# Altium PCB Senzor.PcbDoc
Units mm, origin at the board's own origin, x right, y up, seen from the top; angles counter-clockwise.
Board outline 43 x 72 mm, 2 copper layers (Top Layer, Bottom Layer); 16 components, 7 nets, 41 pads, 1 vias.
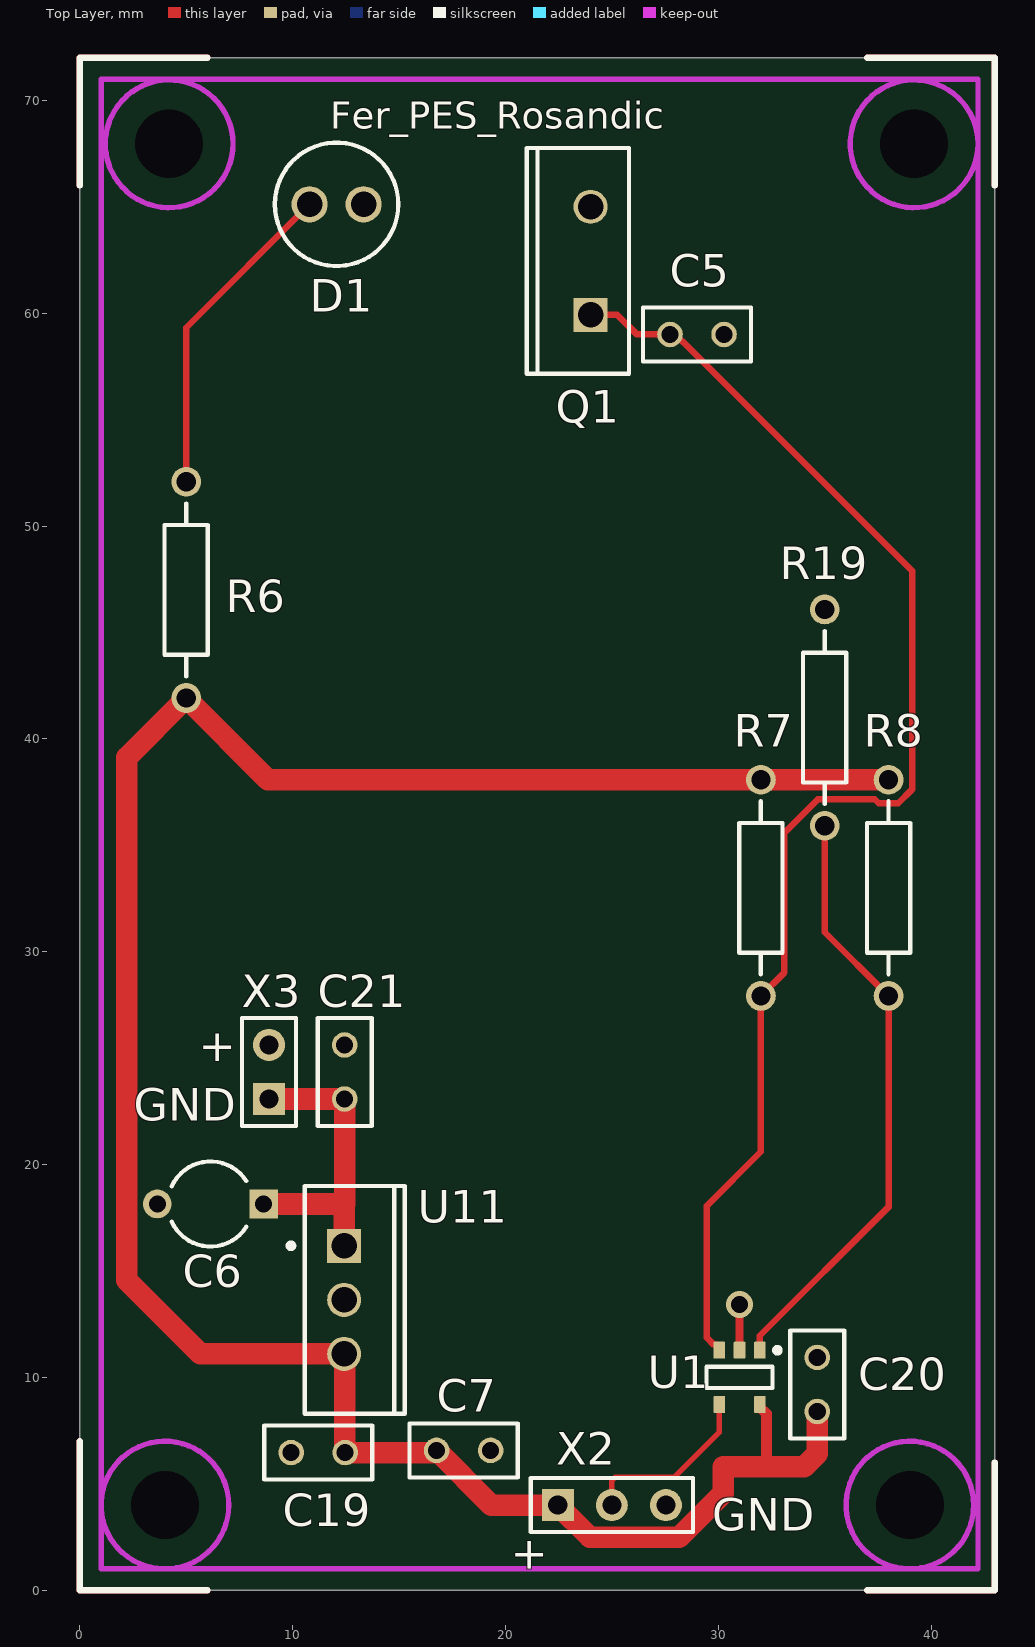
[diagram p0: Top Layer view]
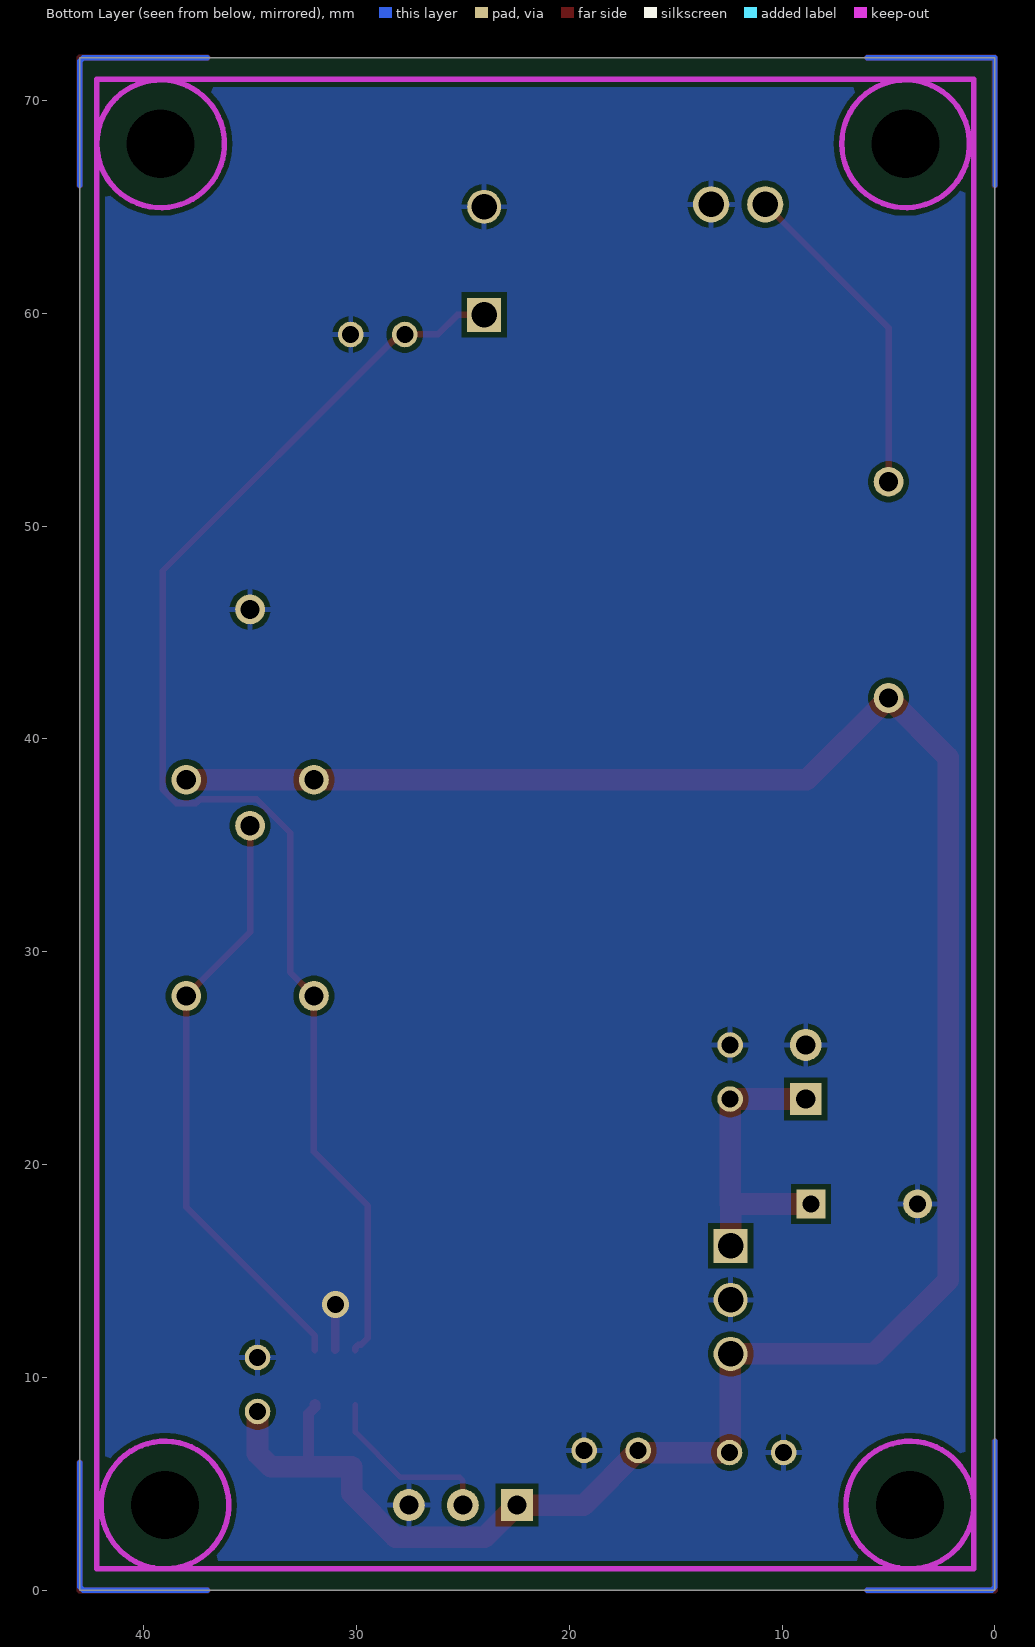
[diagram p1: Bottom Layer view, seen from below]

## Layer stack, top to bottom
Top Solder: solder mask 0.0102, Solder Resist, Dk 3.5
Top Layer: signal copper 0.0356
Dielectric 1: dielectric 0.32, FR-4, Dk 4.8
Bottom Layer: signal copper 0.0356
Bottom Solder: solder mask 0.0102, Solder Resist, Dk 3.5

## Board outline
0,0 43,0 43,72 0,72

## Design rules (kind name [scope] priority, off if disabled: settings)
Clearance [All] p1: gap=0.254 ignorepadtopadclearanceinfootprint=FALSE
HoleSize [All] p1: absolutevalues=TRUE maxlimit=3.2 minlimit=0.5 maxpercent=80.000 minpercent=20.000
PolygonConnect [All] p1: thpad.connectstyle=Relief thpad.reliefconductorwidth=0.254 thpad.reliefentries=4 thpad.polygonreliefangle="90 Angle" thpad.airgapwidth=0.254 smdpad.connectstyle=Relief smdpad.reliefconductorwidth=0.254 smdpad.reliefentries=4 smdpad.polygonreliefangle="90 Angle" smdpad.airgapwidth=0.254 via.connectstyle=Direct via.reliefconductorwidth=0.254 via.reliefentries=4 via.polygonreliefangle="90 Angle" via.airgapwidth=0.254
RoutingVias [All] p1: holewidth=0.5 width=0.7 viastyle="Through Hole" minholewidth=0.5 minwidth=0.7 maxholewidth=0.5 maxwidth=0.7
SilkToSolderMaskClearance SilkToSolderMaskClearance_1 [IsPad] p1: minsilkscreentomaskgap=0.203 clearancetoexposedcopper=TRUE
SilkToSolderMaskClearance [All] p2: minsilkscreentomaskgap=0.254 clearancetoexposedcopper=TRUE
SolderMaskExpansion [All] p1: expansion=0.102 istentingtop=FALSE
SupplyNets "Schematic Supply Nets_2" [InNet('GND')] p1: voltage=0.000
SupplyNets "Schematic Supply Nets_1" [InNet('+12V')] p2: voltage=0.000
SupplyNets "Schematic Supply Nets" [InNet('+5V')] p3: voltage=0.000
Width [All] p1: maxlimit=1.524 minlimit=0.254 preferedwidth=0.305
28 further rules are at their usual default settings.

## Classes and differential pairs
component class DZ1_2_Rosandic_Lovro: C5 C6 C7 C19 C21 D1 Q1 R7 R8 R19 U1 U11 X2 X3

## Components (designator, comment, footprint, x,y, rotation, side; value= is the part's Value field where it differs from the comment)
C5 "1000pF" RAD-0.1 29,59 r180 top
C6 "220u/50V" CAPR5-4x5 6.14,18.147 r180 top
C7 "0.01u" RAD-0.1 18.034,6.568 r180 top
C19 "100n" RAD-0.1 11.201,6.466 r0 top
C20 "100n" RAD-0.1 34.649,9.667 r270 top
C21 "100n" RAD-0.1 12.446,24.348 r270 top
D1 "IR LED" vish-tsal6200 12.065,65.115 r180 top
Q1 "L14G1" TO-220_A 24,62.46 r90 top
R6 "220" AXIAL-0.4 5,47 r90 top
R7 "680k" AXIAL-0.4 32,33 r90 top
R8 "56k" AXIAL-0.4 38,33 r90 top
R19 "56k" AXIAL-0.4 35,41 r270 top
U1 "LM321" DBV0005A_L 31,10 r270 top
U11 "LM341" NDE0003A 12.421,13.641 r270 top
X2 "" HDR1X3 22.46,4 r0 top
X3 "Napajanje 12V" HDR1X2 8.89,23.078 r90 top

## Footprints (in the part's own frame and the unit in brackets; to place one, negate y for a bottom-side part, rotate by r counter-clockwise, add the part's x,y. Pads: shape width x height; smd on the part's side, far side on the other; paste and mask are expansions set on the pad)
AXIAL-0.4 [mm] "Axial Device, Thru-Hole; 2 Leads; 0.4 in Pin Spacing"
  round 1.4 hole 0.9: 1(-5.08,0) 2(5.08,0)
  silkscreen extent -4.06,-1.02 4.06,1.02
CAPR5-4x5 [mm] "Capacitor; 2 Leads"
  rect 1.35x1.35 hole 0.8: 1(-2.5,0)
  round 1.35 hole 0.8: 2(2.5,0)
  silkscreen extent -1.69,-2 1.82,2
DBV0005A_L [mm] "SOT23, 5-Leads, Body 3.05x1.75mm, Pitch 0.95mm, IPC High Density"
  rrect18% 0.8x0.55 smd: 1(-1.275,0.95) 2(-1.275,0) 3(-1.275,-0.95) 4(1.275,-0.95) 5(1.275,0.95)
  silkscreen extent -1.4,-1.55 0.5,1.9, body extent -1.42,-1.46 1.42,1.46, height 1.08
HDR1X2 [mm] "Connector; Header; 2 Position"
  rect 1.5x1.5 hole 0.9: 1(0,0)
  round 1.5 hole 0.9: 2(2.54,0)
  silkscreen extent -1.27,-1.27 3.81,1.27
HDR1X3 [mm] "Connector; Header; 3 Position"
  rect 1.5x1.5 hole 0.9: 1(0,0)
  round 1.5 hole 0.9: 2(2.54,0) 3(5.08,0)
  silkscreen extent -1.27,-1.27 6.35,1.27
NDE0003A [mm] "FM, 3-Leads, Body 10.7x4.7mm, Pitch 2.54mm"
  rect 1.6x1.6 hole 1.2: 1(-2.54,0)
  round 1.6 hole 1.2: 2(0,0) 3(2.54,0)
  silkscreen extent -5.35,-2.62 5.35,2.85, body extent -5.4,-1.9 5.4,2.9, height 19.4
RAD-0.1 [mm] "Radial Cap, Thru-Hole; 2 Leads; 0.1 in Pin Spacing"
  round 1.2 hole 0.8: 1(-1.27,0) 2(1.27,0)
  silkscreen extent -2.54,-1.27 2.54,1.27
TO-220_A [mm] "TO, Thru-Hole, Vertical, Heatsink Mounted; 3 In-Line Leads (1 Absent); Pitch 2.54 mm"
  rect 1.6x1.6 hole 1.2: 1(-2.54,0)
  round 1.6 hole 1.2: 3(2.54,0)
  silkscreen extent -5.3,-1.8 5.3,3
vish-tsal6200 [mm] "THD, 2-Leads, Dia 5.8mm, Pitch 2.54mm"
  round 1.7 hole 1.2: 1(-1.27,0) 2(1.27,0)
  silkscreen extent -2.9,-2.9 2.9,2.9

## Part data
C5 C7 C19 C20 C21: library part Cap, "Capacitor", Dobavljac=DigiKey, PackageReference=RAD-0.3, Proizvođač="Vishay Beyschlag/Draloric/BC Components"
  C5: Cijena=€0,47, Kataloški broj=BC5131-ND, Kućište="2.3x3.4mm; 2 izvoda; pitch 5.0mm; žičani izvodi", Opis="Keramički kondenzator 1000pF", Vrijednost=1000pF
  C7: Cijena=€0,21, Kataloški broj=BC5134-ND, Kućište="2.3x4.0mm; 2 izvoda; pitch 5.0mm; žičani izvodi", Opis="Keramički kondenzator 0.01uF", Vrijednost=0.01uF
  C19 C20 C21: Cijena=€0,23, Kataloški broj=BC3324-ND, Kućište="2.3x6.0mm; 2 izvoda; pitch 7.5mm; žičani izvodi", Opis="Keramički kondenzator 100nF", Vrijednost=100nF
C6: library part Elko, Cijena=€0,69, Dobavljac=DigiKey, Kataloški broj=P5572-ND, Kućište="6.3x11.2mm; 2 izvoda; pitch 2.5mm; žičani izvodi", Opis="Elektrolitski kondenzator 220u/50V", Proizvođač="Panasonic Electronic Components", Vrijednost=220u/50V
D1: library part "INFRARED LED", "940 Nm, Gaalas/gaas, High Power Infrared Emitting Diode Infrared Led, 5MM, 1-ELEMENT, 940NM", Cijena=€0,42, Dobavljac=DigiKey, Kataloški broj=TSAL6200, Kućište="5mm dijametar; 2 izvoda; pitch 2.54mm; žičani izvodi", Opis="Infracrvena LED dioda", Proizvođač="Vishay Semiconductor Opto Division"
Q1: library part "Photo NPN", "NPN Phototransistor", Cijena=€3,13, Dobavljac=DigiKey, Kataloški broj=751-1020-ND, Kućište=1206, Opis="NPN fototranzistor", PackageReference=TO-220_A, Proizvođač="Vishay Semiconductor Opto Division"
R6 R7 R8 R19: library part Res2, "Resistor", Cijena=€0,09, Dobavljac=DigiKey, Kućište="2.4x6.3mm; 2 izvoda; pitch 10mm; žičani izvodi", PackageReference=AXIAL-0.4, Proizvođač=YAGEO
  R6: Kataloški broj=MFR-25FBF52-220R-ND, Opis="Otpornik 220 Ohm", Vrijednost=220
  R7: Kataloški broj=MFR-25FBF52-680K-ND, Opis="Otpornik 680kOhm", Vrijednost=680K
  R8 R19: Kataloški broj=MFR-25FBF52-56K-ND, Opis="Otpornik 56kOhm", Vrijednost=56K
U1: library part CMP-0055-01337-3, "Low Power Single Op Amp, 5-pin SOT-23", Cijena=€0,90, Dobavljac=DigiKey, Kataloški broj=LM321MF/NOPBCT-ND, Kućište=SOT-23-5, Opis="Operacijsko pojačalo", Proizvođač="Texas Instruments"
U11: library part CMP-0062-02431-3, "3-Terminal Positive Voltage Regulators, 3-pin TO-220", Cijena=€1,24, Dobavljac=DigiKey, Kataloški broj=LM341T-5.0/NOPB-ND, Kućište=TO-220, Opis="Pozitivni naponski regulator 5V", PackageReference=NDE0003A, Proizvođač="Texas Instruments"
X2: library part "Header 3", "Header, 3-Pin", Cijena=€0,28, Dobavljac=DigiKey, Kataloški broj=S1011EC-03-ND, Kućište="7.62x2.54mm; 3 izvoda; pitch 2.54mm; žičani izvodi", Opis="3-pinski konektor", Proizvođač="Sullins Connector Solutions"
X3: library part "Header 2", "Header, 2-Pin", Cijena=€0,26, Dobavljac=DigiKey, Kataloški broj=S1011EC-02-ND, Kućište="5.08x2.54mm; 2 izvoda; pitch 2.54mm; žičani izvodi", Opis="2-pinski konektor", Proizvođač="Sullins Connector Solutions"

## Free pads (board coordinates)
  round 3 hole 3.2 unplated: 0(4,4) 0(4.2,67.96) 0(39,4) 0(39.2,67.96)

## Via types
v1: diameter 1.27, hole 0.8, Top Layer to Bottom Layer, tented both sides, 1 vias

## Nets (pads, with @x,y where several pads share a name; then routed paths per layer and width w, separated by ;. In a path a pad name is that pad's centre, name@x,y a point inside that pad or via, vN(x,y) a via of type N, cw(c..) or ccw(c..) an arc to the next point about the centre after c; other vN are vias at no path point)
+5V: C7.2 C19.2 C20.2 R6.1 R7.2 R8.2 U1.5 U11.3 X2.1 | length 110.2
  Top Layer w0.508: U1.5 31.95,8.6 32.258,8.292 32.258,6.314
  Top Layer w1.016: C20.2 34.649,6.419 34.036,5.806 30.226,5.806 30.226,4.548 28.166,2.488 23.972,2.488 X2.1 19.332,4 C7.2 16.714,6.568 16.612,6.466 C19.2 12.446,6.491 12.446,11.076 U11.3 5.663,11.101 2.203,14.561 2.203,39.123 R6.1 8.84,38.08 R7.2 R8.2
+12V: C6.1 C21.2 U11.1 X3.1 | length 14.3
  Top Layer w1.016: C6.1 12.446,18.147 C21.2 X3.1 ; U11.1 12.421,18.147
GND: C5.1 C6.2 C7.1 C19.1 C20.1 C21.1 D1.1 Q1.3 R19.1 U1.2 U11.2 X2.3 X3.2 | length 2.1
  Top Layer w0.381: v1(30.991,13.426) 30.996,13.422 U1.2@30.996,11.279
NetC5_2: C5.2 Q1.1 R7.1 U1.3 | length 63.5
  Top Layer w0.305: Q1.1 25.257,59.92 26.177,59 27.972,59 28.28,58.692 28.308,58.692 39.106,47.894 39.106,37.622 38.458,36.974 37.542,36.974 37.35,37.166 34.681,37.166 33.106,35.591 33.106,29.026 R7.1 32,20.598 29.464,18.062 29.464,11.861 29.802,11.523 29.927,11.523 30.05,11.4 U1.3
NetD1_2: D1.2 R6.2 | length 15.4
  Top Layer w0.305: R6.2 5,59.32 D1.2
NetR8_1: R8.1 R19.2 U1.1 | length 28.4
  Top Layer w0.305: U1.1 31.954,11.279 31.954,11.954 38,18 R8.1 35,30.92 R19.2
NetU1_4: U1.4 X2.2 | length 8.4
  Top Layer w0.254: X2.2 25,5.149 25.149,5.298 27.925,5.298 30.05,7.423 U1.4
copper on no net: | length 97.7
  Top Layer w0.305: 0,7 0,0 6,0 ; 0,66 0,72 6,72 ; 37,0 43,0 43,6 ; 37,72 43,72 43,66
  Bottom Layer w0.254: 0,7 0,0.149 0.149,0 6,0 ; 0,66 0,72 6,72 ; 37,0 42.851,0 43,0.149 43,5 43,6 ; 37,72 42.851,72 43,71.851 43,66

## Polygon pours and split planes (outlines as drawn)
GND on Bottom Layer "NONET_L02_P-001" (solid, remove dead copper, pour order 0): 1,71 42,71 42,1 1,1

## Keep-outs
Keep-Out Layer:
  circle w0.254: c4.2,67.96 r3
  circle w0.254: c4,4 r3
  circle w0.254: c39,4 r3
  circle w0.254: c39.2,67.96 r3
  lines w0.254: 1,1 42.2,1 42.2,71 1,71 1,1

## Silkscreen, mask and mechanical layers (free items; w line width, h text height)
Top Overlay:
  lines w0.305: 0,7 0,0 6,0 ; 0,66 0,72 6,72 ; 37,0 43,0 43,6 ; 37,72 43,72 43,66
  text "Fer_PES_Rosandic" at 11.778,68.675 h1.27
  text "+" at 5.588,24.856 h1.52
  text "GND" at 2.54,22.062 h1.52
  text "GND" at 29.718,2.794 h1.52
  text "+" at 20.254,1 h1.52
Mechanical 1:
  the board outline again, w0.254
Drill Drawing:
  lines w0.254: 104.709,25.567 105.133,25.567 105.556,25.144 105.979,25.567 106.403,25.567 105.979,25.99 106.403,26.413 105.979,26.413 105.556,26.837 105.133,26.413 104.709,26.413 105.133,25.99 104.709,25.567 ; 104.709,28.954 105.556,29.377 106.403,28.954 105.979,29.8 106.403,30.647 105.556,30.223 104.709,30.647 105.133,29.8 104.709,28.954 ; 104.709,33.187 105.133,33.187 105.133,32.764 105.979,32.764 105.979,33.187 106.403,33.187 106.403,34.033 105.979,34.033 105.979,34.457 105.133,34.457 105.133,34.033 104.709,34.033 104.709,33.187 ; 104.709,36.574 106.403,36.574 106.403,38.267 104.709,38.267 104.709,36.574 ; 105.048,36.912 106.064,36.912 106.064,37.928 105.048,37.928 105.048,36.912
  lines w0.381: 103.19,24.001 371.188,24.001 ; 103.19,39.241 371.188,39.241 ; 117.183,20.191 117.183,43.051 ; 130.895,20.191 130.895,43.051 ; 160.604,20.191 160.604,43.051 ; 173.454,20.191 173.454,43.051 ; 192.092,20.191 192.092,43.051 ; 230.181,20.191 230.181,43.051 ; 245.163,20.191 245.163,43.051 ; 264.106,20.191 264.106,43.051 ; 280.612,20.191 280.612,43.051 ; 302.298,20.191 302.298,43.051 ; 336.171,20.191 336.171,43.051 ; 103.19,20.191 371.188,20.191 371.188,43.051 103.19,43.051 103.19,20.191
  text "Symbol" at 105.476,40.384 h1.83
  text "Count" at 118.326,40.384 h1.83
  text "Hole Size" at 132.038,40.384 h1.83
  text "Plated" at 161.747,40.384 h1.83
  text "Hole Type" at 174.597,40.384 h1.83
  text "Drill Layer Pair" at 193.235,40.384 h1.83
  text "Via/Pad" at 231.324,40.384 h1.83
  text "Pad Shape" at 246.306,40.384 h1.83
  text "Template" at 265.249,40.384 h1.83
  text "Description" at 281.755,40.384 h1.83
  text "Hole Tolerance (+)" at 303.441,40.384 h1.83
  text "Hole Tolerance (-)" at 337.314,40.384 h1.83
  text "4" at 118.326,36.574 h1.52
  text "125,98mil (3,200mm)" at 132.038,36.574 h1.52
  text "NPTH" at 161.747,36.574 h1.52
  text "Round" at 174.597,36.574 h1.52
  text "Top Layer - Bottom Layer" at 193.235,36.574 h1.52
  text "Pad" at 231.324,36.574 h1.52
  text "Rounded" at 246.306,36.574 h1.52
  text "c300hn320" at 265.249,36.574 h1.52
  text "7" at 118.326,32.764 h1.52
  text "47,24mil (1,200mm)" at 132.038,32.764 h1.52
  text "PTH" at 161.747,32.764 h1.52
  text "Round" at 174.597,32.764 h1.52
  text "Top Layer - Bottom Layer" at 193.235,32.764 h1.52
  text "Pad" at 231.324,32.764 h1.52
  text "(Mixed)" at 246.306,32.764 h1.52
  text "(Mixed)" at 265.249,32.764 h1.52
  text "13" at 118.326,28.954 h1.52
  text "31,50mil (0,800mm)" at 132.038,28.954 h1.52
  text "PTH" at 161.747,28.954 h1.52
  text "Round" at 174.597,28.954 h1.52
  text "Top Layer - Bottom Layer" at 193.235,28.954 h1.52
  text "(Mixed)" at 231.324,28.954 h1.52
  text "(Mixed)" at 246.306,28.954 h1.52
  text "(Mixed)" at 265.249,28.954 h1.52
  text "13" at 118.326,25.144 h1.52
  text "35,43mil (0,900mm)" at 132.038,25.144 h1.52
  text "PTH" at 161.747,25.144 h1.52
  text "Round" at 174.597,25.144 h1.52
  text "Top Layer - Bottom Layer" at 193.235,25.144 h1.52
  text "Pad" at 231.324,25.144 h1.52
  text "(Mixed)" at 246.306,25.144 h1.52
  text "(Mixed)" at 265.249,25.144 h1.52
  text "37 Total" at 118.326,21.334 h1.52

## Dimensions
43,0 to 43,72 on Mechanical 1
0,0 to 43,72 on Mechanical 1